# Altium PCB Car_wash_machine.PcbDoc (part 1 of 6)
Units mm, origin at the board's own origin, x right, y up, seen from the top; angles counter-clockwise.
Board outline 229.74 x 149.86 mm, 2 copper layers (Top Layer, Bottom Layer); 256 components, 170 nets, 868 pads, 731 vias.
Unrouted connection lines stored in the file: 362.
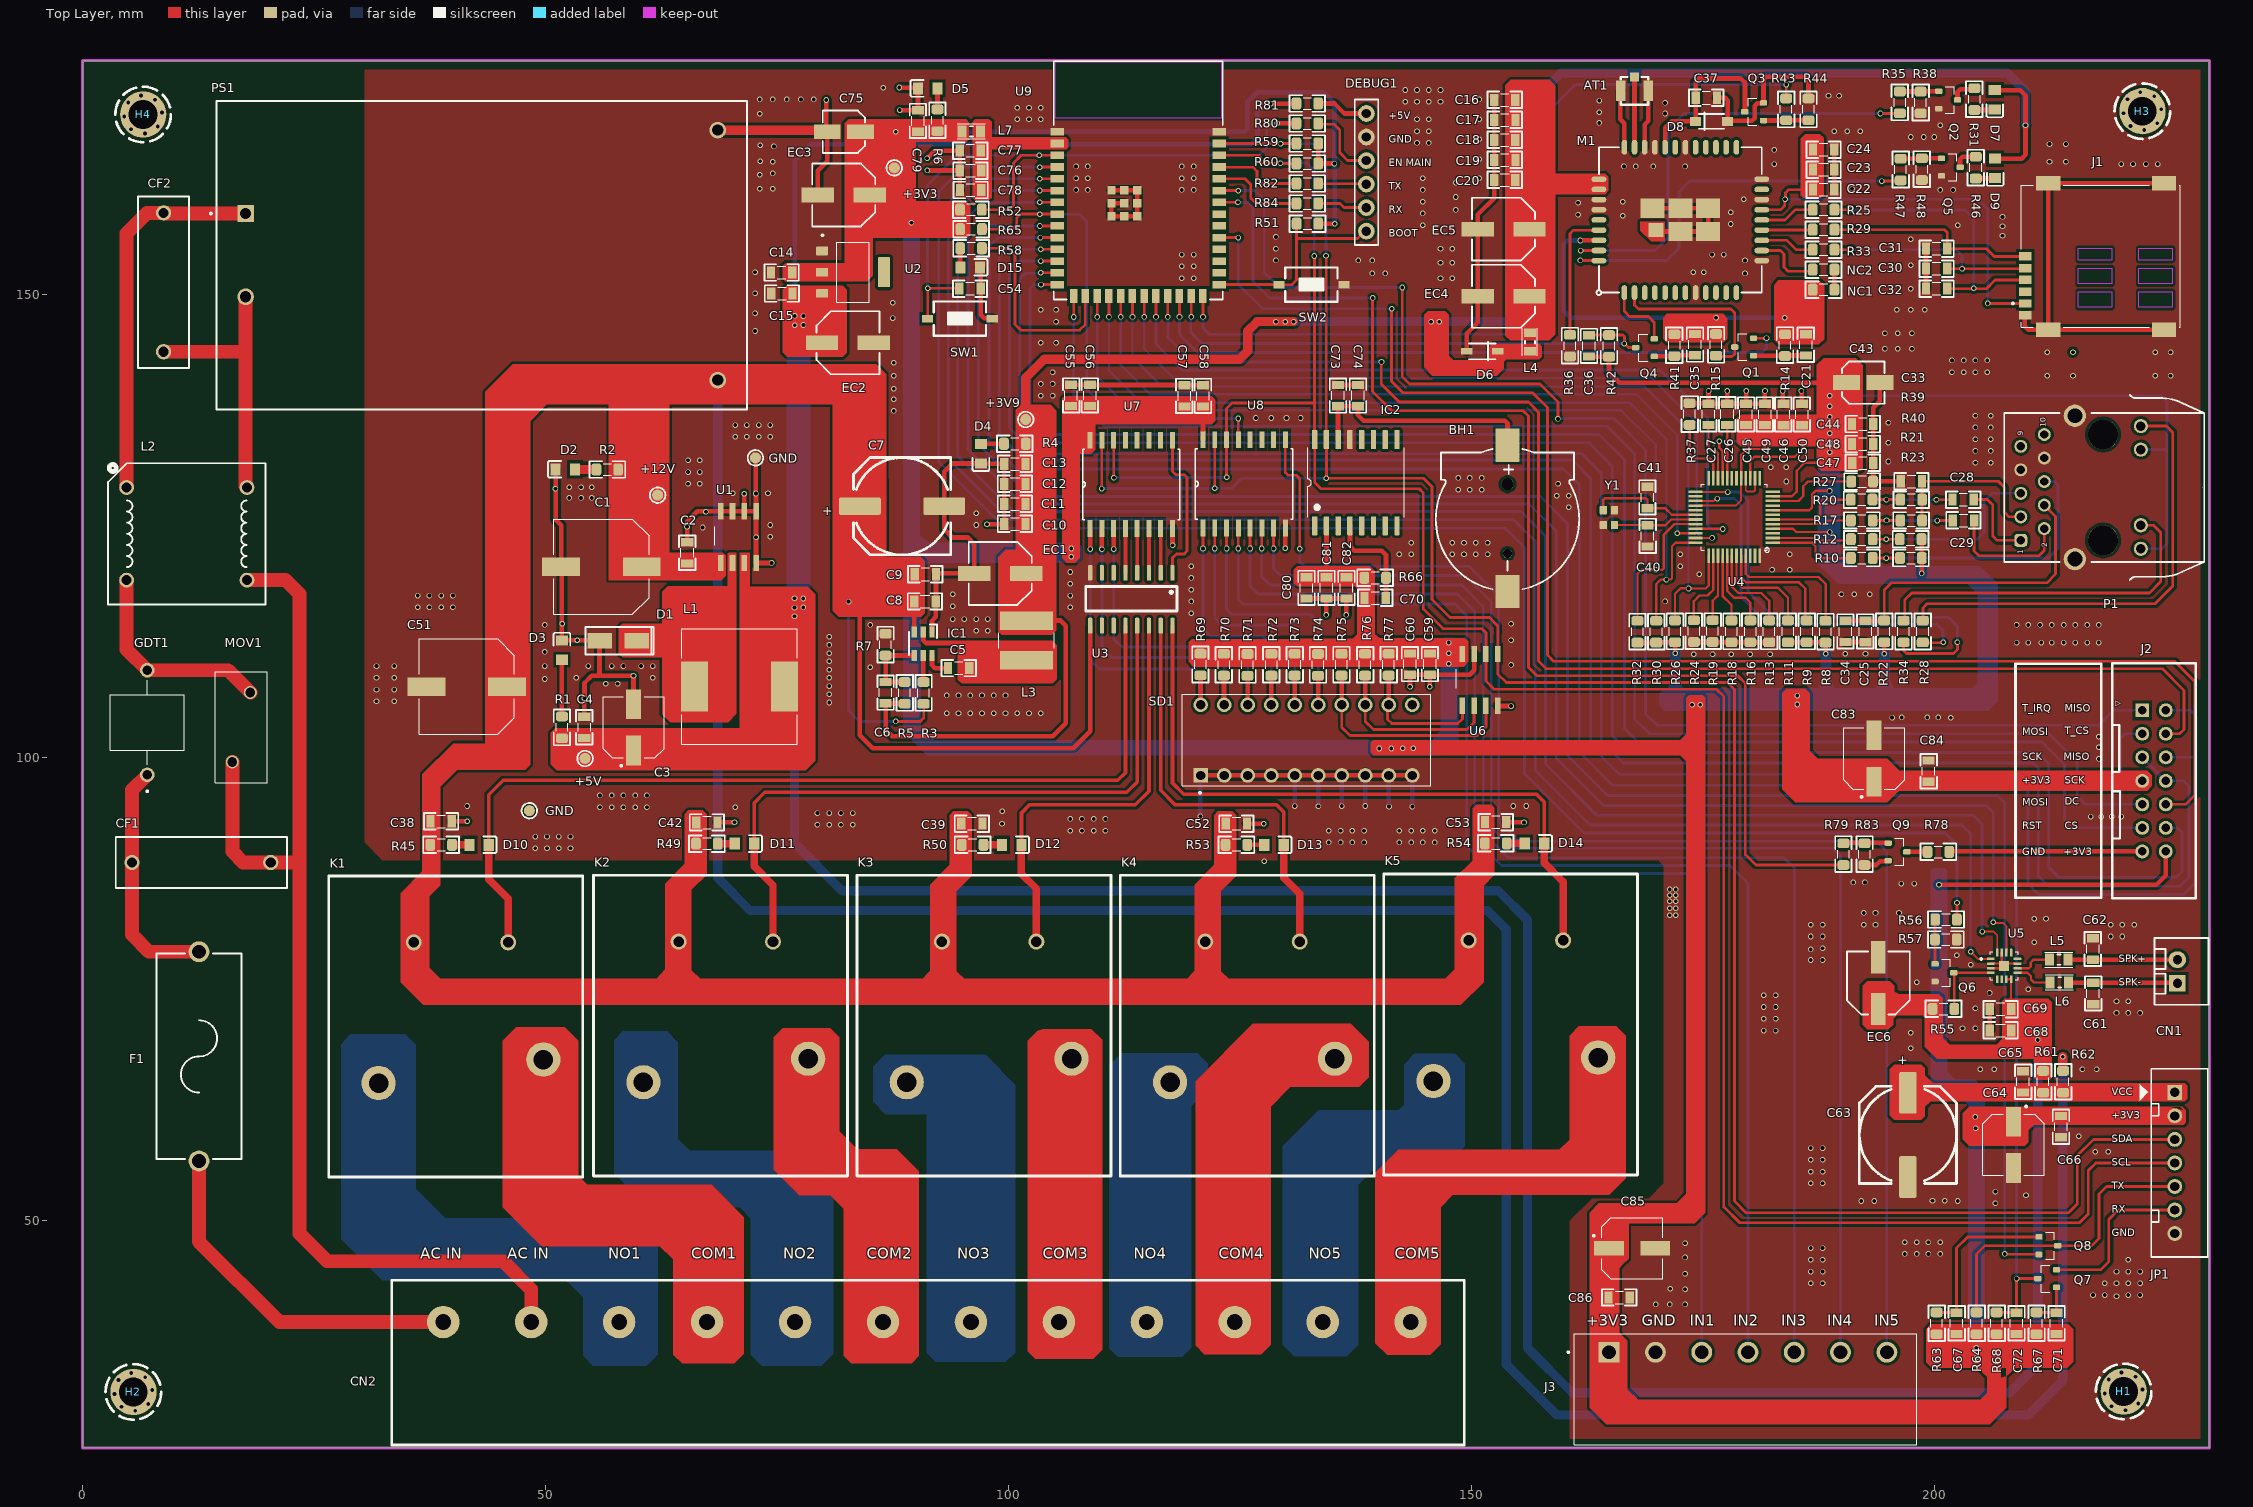
[diagram p0: Top Layer view]
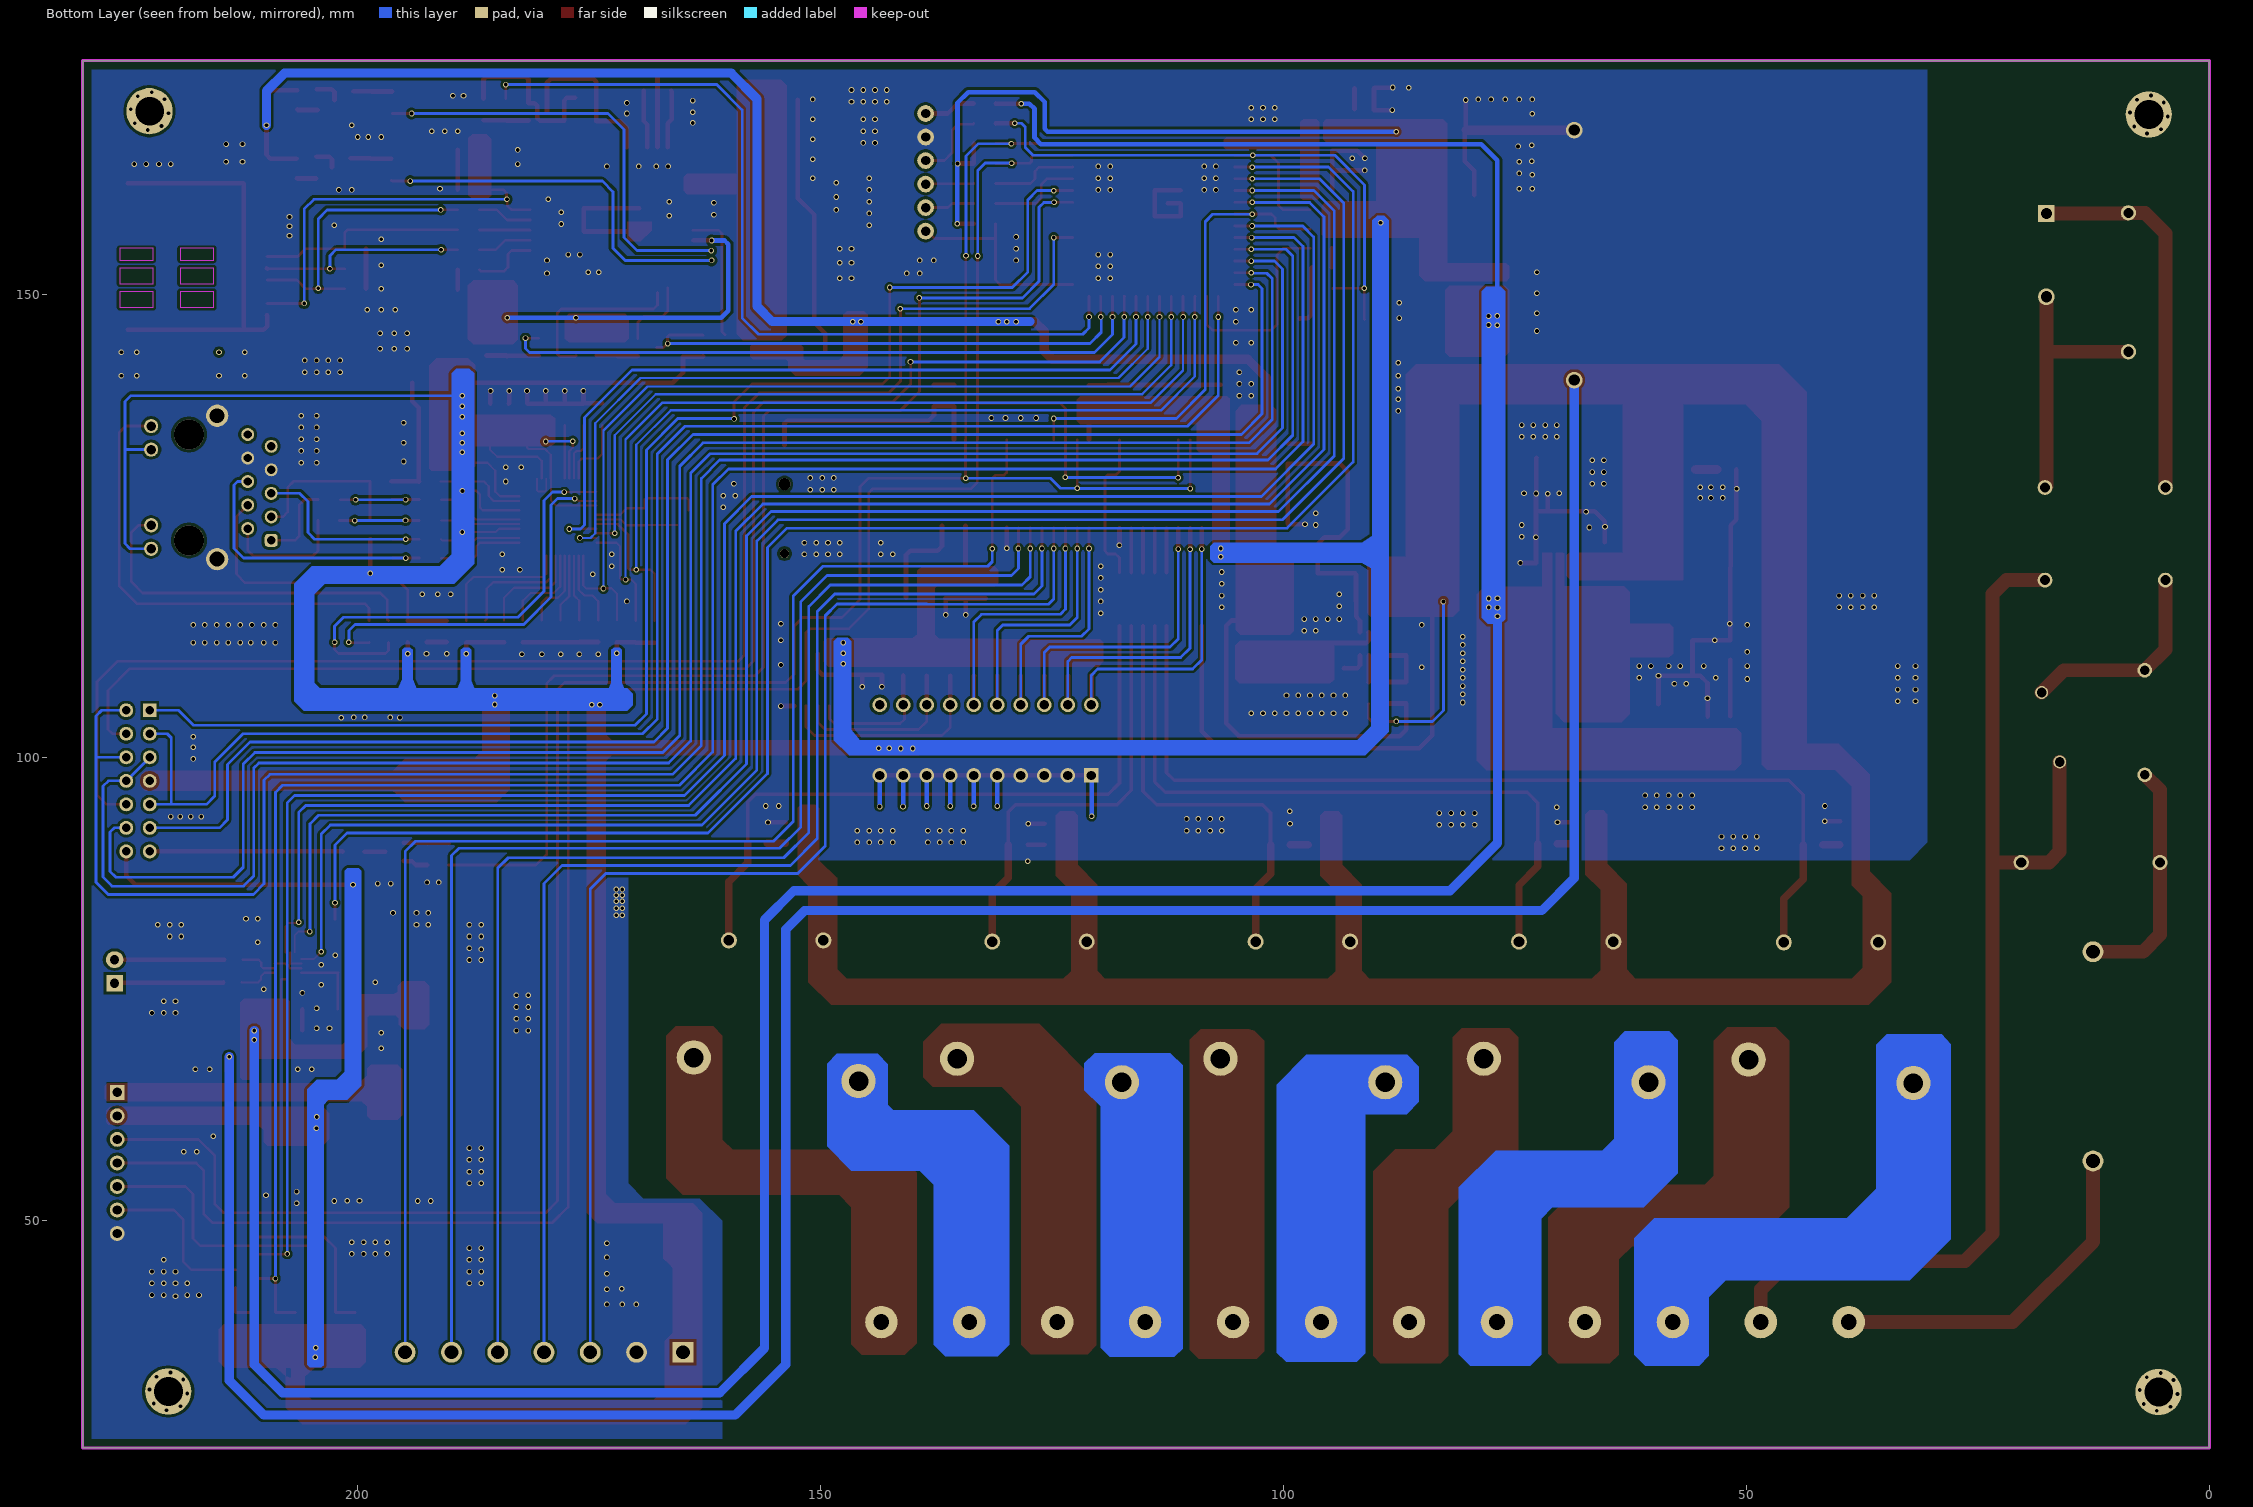
[diagram p1: Bottom Layer view, seen from below]
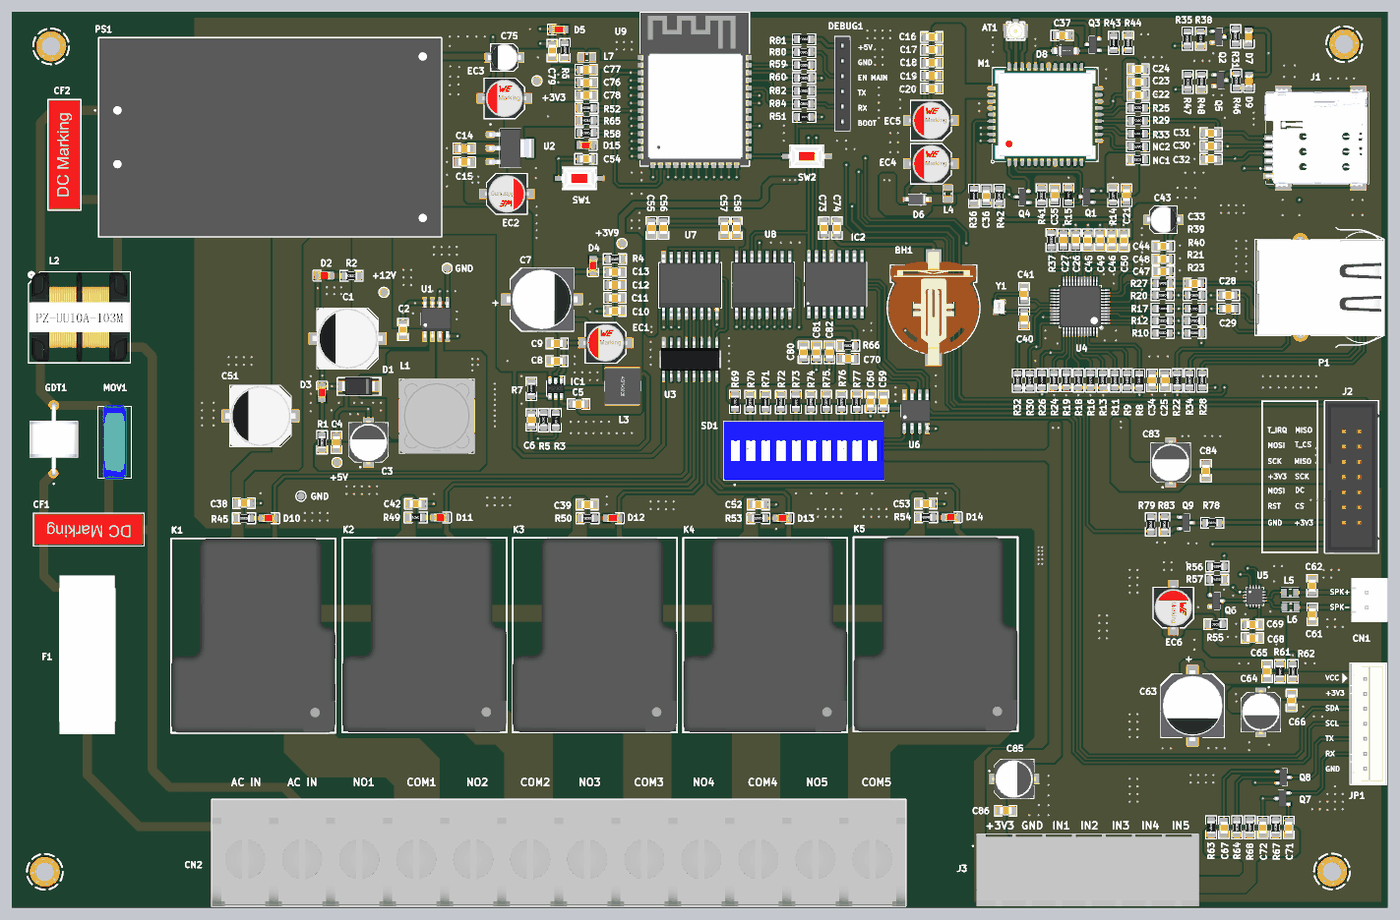
[diagram p4: 3D render of the assembled board from above, using the file's embedded part models]

## Layer stack, top to bottom
Top Solder: solder mask 0.0102, Solder Resist, Dk 3.5
Top Layer: signal copper 0.0356
Dielectric 1: dielectric 0.32, FR-4, Dk 4.8
Bottom Layer: signal copper 0.0356
Bottom Solder: solder mask 0.0102, Solder Resist, Dk 3.5

## Board outline
0,25.4 0,175.26 229.743,175.26 229.743,25.4

## Design rules (kind name [scope] priority, off if disabled: settings)
BoardOutlineClearance [All] p1: gap=1 ignorepadtopadclearanceinfootprint=FALSE
Clearance [All] p1: gap=0.3 ignorepadtopadclearanceinfootprint=FALSE
PolygonConnect [All] p1: connectstyle=Direct reliefconductorwidth=0.254 reliefentries=4 polygonreliefangle="90 Angle" airgapwidth=0.254
RoutingVias [All] p1: holewidth=0.6 width=0.8 viastyle="Through Hole" minholewidth=0.4 minwidth=0.6 maxholewidth=0.8 maxwidth=1
SolderMaskExpansion [All] p1: expansion=0.102 istentingtop=FALSE
Width [All] p1: maxlimit=2 minlimit=0.15 preferedwidth=0.5
30 further rules are at their usual default settings.

## Classes and differential pairs
component class POWER_CAR_WASH_MACHINE: +3V3 +3V9 +5V +12V ? C1 C2 C3 C4 C5 C6 C7 C8 C9 C10 C11 C12 C13 C14 C15 CF1 CF2 D1 D2 D3 D4 D5 EC1 EC2 EC3 F1 GDT1 GND IC1 L1 L2 L3 LED? MOV1 PS1 R1 R2 R3 R4 R5 R6 R7 U1 U2
component class MCU_WASH_MACHINE: AT1 BH1 BH? C16 C17 C18 C19 C20 C21 C22 C23 C24 C25 C26 C27 C28 C29 C30 C31 C32 C33 C34 C35 C36 C37 C38 C39 C40 C41 C42 C43 C44 C45 C46 C47 C48 C49 C50 C51 C52 C53 C54 C55 C56 C57 C58 C59 C60 C61 C62 C63 C64 C65 C66 C67 C68 C69 C70 C71 C72 C73 C74 C75 C76 C77 C78 C79 C80 C81 C82 C83 C84 C85 C86 CN1 CN2 D6 D7 D8 D9 D10 D11 D12 D13 D14 D15 DEBUG1 EC4 EC5 EC6 H1 H2 H3 H4 IC2 J1 J2 J3 JP1 K1 K2 K3 K4 K5 L4 L5 L6 L7 M1 NC1 NC2 P1 Q1 Q2 Q3 Q4 Q5 Q6 Q7 Q8 Q9 R8 R9 R10 R11 R12 R13 R14 R15 R16 R17 R18 R19 R20 R21 R22 R23 R24 R25 R26 R27 R28 R29 R30 R31 R32 R33 R34 R35 R36 R37 R38 R39 R40 R41 R42 R43 R44 R45 R46 R47 R48 R49 R50 R51 R52 R53 R54 R55 R56 R57 R58 R59 R60 R61 R62 R63 R64 R65 R66 R67 R68 R69 R70 R71 R72 R73 R74 R75 R76 R77 R78 R79 R80 R81 R82 R83 R84 SD1 SW1 SW2 U3 U4 U5 U6 U7 U8 U9 Y1

## Components (designator, comment, footprint, x,y, rotation, side; value= is the part's Value field where it differs from the comment)
+3V3 "TP_1MM" PAD_SMD_D1.2MM 87.681,163.678 r90 top
+3V9 "TP_1MM" PAD_SMD_D1.2MM 101.879,136.487 r90 top
+5V "TP_1MM" "PAD_SMD_D1.2MM - duplicate1" 54.28,99.873 r90 top
+12V "TP_1MM" PAD_SMD_D1.2MM 62.116,128.321 r90 top
AT1 "Antenna_IPEX" IPEX 167.64,171.996 r90 top
BH1 "CR1220" BATT_HOLDER_COIL12.5MM 153.924,125.517 r270 top
C1 "CAP_ALU_470uF_35V_SMD" CAP_ALU_470UF_35V 56.051,120.587 r180 top
C2 "1uF 50V" CAP-CER_0805_L2W1.25H0.8_WAVE 65.316,122.092 r90 top
C3 "220uF_16V" "CAP ALUM 220UF 20% 16V SMD" 59.525,103.238 r90 top
C4 "0.1uF 50V" CAP-CER_0805_L2W1.25H0.6_WAVE 54.191,103.238 r90 top
C5 "0.33uF 50V" CAP-CER_0805_L2W1.25H0.6_WAVE 94.64,109.639 r0 top
C6 "1nF 50V" CAP-CER_0805_L2W1.25H0.6_WAVE 86.741,106.985 r90 top
C7 "220uF_35V" C_FC_220UF_35V 88.519,127.127 r0 top
C8 "10uF 25V" CAP-CER_0805_L2W1.25H0.8_WAVE 90.995,116.84 r0 top
C9 "0.1uF 50V" CAP-CER_0805_L2W1.25H0.6_WAVE 91.034,119.774 r0 top
C10 "22uF 25V" CAP-CER_0805_L2W1.25H0.6_WAVE 100.711,125.222 r180 top
C11 "22uF 25V" CAP-CER_0805_L2W1.25H0.6_WAVE 100.711,127.381 r180 top
C12 "10uF 25V" CAP-CER_0805_L2W1.25H0.8_WAVE 100.711,129.54 r180 top
C13 "0.1uF 50V" CAP-CER_0805_L2W1.25H0.6_WAVE 100.711,131.699 r180 top
C14 "0.1uF 50V" CAP-CER_0805_L2W1.25H0.6_WAVE 75.514,152.375 r180 top
C15 "0.1uF 50V" CAP-CER_0805_L2W1.25H0.6_WAVE 75.54,150.101 r180 top
C16 "10pF/50V" CAP-CER_0805_L2W1.25H0.6_WAVE 153.625,171.018 r0 top
C17 "33pF 50V" CAP-CER_0805_L2W1.25H0.6_WAVE 153.632,168.859 r0 top
C18 "1nF 50V" CAP-CER_0805_L2W1.25H0.6_WAVE 153.625,166.7 r0 top
C19 "0.1uF 50V" CAP-CER_0805_L2W1.25H0.6_WAVE 153.632,164.541 r0 top
C20 "1uF 50V" CAP-CER_0805_L2W1.25H0.8_WAVE 153.625,162.382 r0 top
C21 "1nF 50V" CAP-CER_0805_L2W1.25H0.6_WAVE 186.144,144.558 r270 top
C22 "0.22uF/25V" CAP-CER_0805_L2W1.25H0.6_Wave 188.069,161.315 r0 top
C23 "10uF 25V" CAP-CER_0805_L2W1.25H0.8_WAVE 188.069,163.474 r180 top
C24 "0.1uF 50V" CAP-CER_0805_L2W1.25H0.6_WAVE 188.069,165.633 r180 top
C25 "0.1uF 50V" CAP-CER_0805_L2W1.25H0.6_Wave 192.583,113.594 r90 top
C26 "10uF 25V" CAP-CER_0805_L2W1.25H0.8_WAVE 177.66,137.053 r270 top
C27 "0.1uF 50V" CAP-CER_0805_L2W1.25H0.6_WAVE 175.628,137.053 r270 top
C28 "6.8nF 50V" CAP-CER_0805_L2W1.25H0.6_WAVE 203.149,127.838 r180 top
C29 "6.8nF 50V" CAP-CER_0805_L2W1.25H0.6_WAVE 203.175,125.603 r180 top
C30 "22pF 50V" CAP-CER_0805_L2W1.25H0.6_WAVE 200.273,152.779 r180 top
C31 "22pF 50V" CAP-CER_0805_L2W1.25H0.6_WAVE 200.273,154.938 r180 top
C32 "22pF 50V" CAP-CER_0805_L2W1.25H0.6_WAVE 200.273,150.62 r180 top
C33 "0.1uF 50V" CAP-CER_0805_L2W1.25H0.6_Wave 197.554,129.819 r180 top
C34 "22nF 50V" CAP-CER_0805_L2W1.25H0.6_WAVE 190.424,113.607 r270 top
C35 "1nF 50V" CAP-CER_0805_L2W1.25H0.6_WAVE 174.18,144.577 r270 top
C36 "470pF 50V" CAP-CER_0805_L2W1.25H0.6_WAVE 162.725,144.443 r90 top
C37 "100pF 50V" CAP-CER_0805_L2W1.25H0.6_WAVE 175.4,171.247 r0 top
C38 "0.1uF 50V" CAP-CER_0805_L2W1.25H0.6_WAVE 38.728,93.091 r0 top
C39 "0.1uF 50V" CAP-CER_0805_L2W1.25H0.6_WAVE 96.068,92.837 r0 top
C40 "15pF 25V" CAP-CER_0805_L2W1.25H0.6_Wave 169.062,123.92 r270 top
C41 "15pF 25V" CAP-CER_0805_L2W1.25H0.6_Wave 169.037,128.067 r90 top
C42 "0.1uF 50V" CAP-CER_0805_L2W1.25H0.6_WAVE 67.437,92.964 r0 top
C43 "10uF 16V" C-ELEC-ALU-B-D4.0-H5.4-SM 192.345,140.475 r0 top
C44 "0.1uF 50V" CAP-CER_0805_L2W1.25H0.6_WAVE 192.291,136.004 r0 top
C45 "0.1uF 50V" CAP-CER_0805_L2W1.25H0.6_WAVE 179.692,137.046 r90 top
C46 "0.1uF 50V" CAP-CER_0805_L2W1.25H0.6_Wave 183.718,137.033 r90 top
C47 "0.1uF 50V" CAP-CER_0805_L2W1.25H0.6_WAVE 192.298,131.813 r0 top
C48 "0.1uF 50V" CAP-CER_0805_L2W1.25H0.6_WAVE 192.291,133.845 r0 top
C49 "0.1uF 50V" CAP-CER_0805_L2W1.25H0.6_WAVE 181.724,137.046 r90 top
C50 "0.1uF 50V" CAP-CER_0805_L2W1.25H0.6_WAVE 185.725,137.033 r90 top
C51 "CAP_ALU_470uF_35V_SMD" CAP_ALU_470UF_35V 41.504,107.645 r180 top
C52 "0.1uF 50V" CAP-CER_0805_L2W1.25H0.6_WAVE 124.638,92.837 r0 top
C53 "0.1uF 50V" CAP-CER_0805_L2W1.25H0.6_WAVE 152.647,92.989 r0 top
C54 "0.1uF 50V" CAP-CER_0805_L2W1.25H0.6_WAVE 95.86,150.622 r180 top
C55 "10uF 25V" CAP-CER_0805_L2W1.25H0.8_WAVE 106.794,139.09 r90 top
C56 "0.1uF 50V" CAP-CER_0805_L2W1.25H0.6_WAVE 108.814,139.09 r90 top
C57 "10uF 25V" CAP-CER_0805_L2W1.25H0.8_WAVE 119.012,139.04 r90 top
C58 "0.1uF 50V" CAP-CER_0805_L2W1.25H0.6_WAVE 121.031,139.04 r90 top
C59 "10uF 25V" CAP-CER_0805_L2W1.25H0.8_WAVE 145.542,110.071 r270 top
C60 "0.1uF 50V" CAP-CER_0805_L2W1.25H0.6_WAVE 143.383,110.071 r270 top
C61 "220pF 50V" CAP-CER_0805_L2W1.25H0.6_WAVE 217.195,74.491 r270 top
C62 "220pF 50V" CAP-CER_0805_L2W1.25H0.6_WAVE 217.145,79.293 r90 top
C63 "220uF_35V" C_FC_220UF_35V 197.18,59.207 r270 top
C64 "220uF_16V" "CAP ALUM 220UF 20% 16V SMD" 208.585,58.13 r270 top
C65 "0.1uF 50V" CAP-CER_0805_L2W1.25H0.6_WAVE 209.626,64.948 r90 top
C66 "0.1uF 50V" CAP-CER_0805_L2W1.25H0.6_WAVE 213.716,60.096 r270 top
C67 "1nF 50V" CAP-CER_0805_L2W1.25H0.6_Wave 202.438,38.862 r90 top
C68 "10uF 25V" CAP-CER_0805_L2W1.25H0.8_WAVE 207.181,70.51 r180 top
C69 "0.1uF 50V" CAP-CER_0805_L2W1.25H0.6_WAVE 207.181,72.796 r180 top
C70 "0.1uF 50V" CAP-CER_0805_L2W1.25H0.6_WAVE 139.629,117.234 r0 top
C71 "1nF 50V" CAP-CER_0805_L2W1.25H0.6_Wave 213.233,38.862 r90 top
C72 "470pF 50V" CAP-CER_0805_L2W1.25H0.6_Wave 208.915,38.862 r90 top
C73 "0.1uF 50V" CAP-CER_0805_L2W1.25H0.6_WAVE 135.611,139.072 r90 top
C74 "10uF 25V" CAP-CER_0805_L2W1.25H0.8_WAVE 137.77,139.072 r90 top
C75 "10uF 16V" C-ELEC-ALU-B-D4.0-H5.4-SM 82.233,167.576 r180 top
C76 "10uF 25V" CAP-CER_0805_L2W1.25H0.8_WAVE 95.91,163.373 r180 top
C77 "0.1uF 50V" CAP-CER_0805_L2W1.25H0.6_WAVE 95.885,165.532 r180 top
C78 "1nF 50V" CAP-CER_0805_L2W1.25H0.6_WAVE 95.923,161.277 r180 top
C79 "10uF 25V" CAP-CER_0805_L2W1.25H0.8_WAVE 90.233,168.738 r90 top
C80 "0.1uF 50V" CAP-CER_0805_L2W1.25H0.6_WAVE 132.207,118.305 r270 top
C81 "10uF 25V" CAP-CER_0805_L2W1.25H0.8_WAVE 134.366,118.305 r270 top
C82 "1nF 50V" CAP-CER_0805_L2W1.25H0.6_WAVE 136.525,118.305 r270 top
C83 "220uF_16V" "CAP ALUM 220UF 20% 16V SMD" 193.523,99.873 r90 top
C84 "0.1uF 50V" CAP-CER_0805_L2W1.25H0.6_WAVE 199.415,98.501 r90 top
C85 "220uF_16V" "CAP ALUM 220UF 20% 16V SMD" 167.386,46.965 r0 top
C86 "0.1uF 50V" CAP-CER_0805_L2W1.25H0.6_WAVE 165.989,41.656 r0 top
CF1 "0.1uF 275V" "CAP_FILM_TH; 18X5X11MM; PITCH15MM_LONG-PIN" 12.827,88.646 r180 top
CF2 "0.1uF 275V" "CAP_FILM_TH; 18X5X11MM; PITCH15MM_LONG-PIN" 8.75,151.313 r90 top
CN1 "2.54mm" 2P-2.54MM-DT 226.289,76.873 r90 top
CN2 "TERMINAL 12P" TERMINAL_12P_9.5MM 38.962,38.989 r0 top
D1 "1N5822(SS34)-SM" SMA-J_DO-214AC 57.874,112.598 r0 top
D2 "Red, 2V, 140°" LED_0805_RED 52.146,131.115 r0 top
D3 "Red, 2V, 140°" LED_0805_RED 51.778,111.582 r270 top
D4 "PWR SIM" LED_0805_RED 97.041,132.791 r90 top
D5 "Red, 2V, 140°" LED_0805_RED 91.304,172.263 r0 top
D6 "SMF5.0A TVS Diode" SOD-123 151.191,143.857 r180 top
D7 "Amber, 2V, 140°" LED_0805_AMBER 206.554,171.023 r90 top
D8 "SMF5.0A" SOD-123F/SOD-123FL 175.953,168.694 r0 top
D9 "Amber, 2V, 140°" LED_0805_AMBER 206.601,163.618 r90 top
D10 "Red, 2V, 140°" LED_0805_RED 42.833,90.551 r180 top
D11 "Red, 2V, 140°" LED_0805_RED 71.501,90.678 r180 top
D12 "Red, 2V, 140°" LED_0805_RED 100.364,90.551 r180 top
D13 "Red, 2V, 140°" LED_0805_RED 128.702,90.551 r180 top
D14 "Red, 2V, 140°" LED_0805_RED 156.845,90.703 r180 top
D15 "Red, 2V, 140°" LED_0805_RED 95.876,152.933 r180 top
DEBUG1 "DEBUG" JP1X6F-P2.54-TH 138.684,163.195 r270 top
EC1 "100uF 16V" CAP_ALU;SMD,D6.3H5.8 99.13,119.863 r0 top
EC2 "100uF 16V" CAP_ALU;SMD,D6.3H5.8 82.677,144.78 r180 top
EC3 "100uF 16V" CAP_ALU;SMD,D6.3H5.8 82.226,160.744 r0 top
EC4 "100uF 16V" CAP_ALU;SMD,D6.3H5.8 153.499,149.809 r0 top
EC5 "100uF 16V" CAP_ALU;SMD,D6.3H5.8 153.499,157.048 r0 top
EC6 "100uF 16V" CAP_ALU;SMD,D6.3H5.8 193.98,75.616 r270 top
F1 "FUSE" FUSE_BOX_D5L20MM 12.573,67.691 r90 top
GDT1 "470V 5KA" GDT;470V,5KA 6.985,103.759 r90 top
GND "TP_1MM" PAD_SMD_D1.2MM 48.26,94.234 r90 top
GND "TP_1MM" PAD_SMD_D1.2MM 72.682,132.347 r90 top
H1 "HOLE_3M" HOLE_M3 219.964,34.417 r0 top
H2 "HOLE_3M" HOLE_M3 4.976,34.364 r0 top
H3 "HOLE_3M" HOLE_M3 221.996,172.72 r0 top
H4 "HOLE_3M" HOLE_M3 6.022,172.362 r0 top
IC1 "AP62300" SOT-23-6 90.805,112.268 r270 top
IC2 "DS3231SN#T&R" SOIC_16_WIDE 137.541,129.667 r90 top
J1 "MSIM-2-A" MSIM-2-A 218.022,154.1 r90 top
J2 "14P_2.54MM" HEADER_2.54MM_1X7P 223.761,97.46 r270 top
J3 "TERMINAL_7P_5.08" TE_796644-7 179.651,31.738 r0 top
JP1 "JP7" CON7 226.009,56.185 r270 top value="Connector 7"
K1 "Relay_4P_30A_1" RELAY_4P_PR23-24V-900-1A 40.374,70.85 r180 top
K2 "Relay_4P_30A_1" RELAY_4P_PR23-24V-900-1A 68.979,70.937 r180 top
K3 "Relay_4P_30A_1" RELAY_4P_PR23-24V-900-1A 97.427,70.937 r180 top
K4 "Relay_4P_30A_1" RELAY_4P_PR23-24V-900-1A 125.875,70.937 r180 top
K5 "Relay_4P_30A_1" RELAY_4P_PR23-24V-900-1A 154.323,71.064 r180 top
L1 "68uH 3A" 12X12_68uH_2A 70.955,107.645 r0 top
L2 "SU10VD-10020" CHOKE_UU10 11.252,124.142 r0 top
L3 "3.3uH 3.4A" "IND_SMD 6X6X2.8MM" 101.956,112.624 r90 top
L4 "BLM21PG300SN1D" L0805 156.35,144.856 r90 top value=1K
L5 "BLM21PG300SN1D" L0805 213.462,78.143 r180 top value=1K
L6 "BLM21PG300SN1D" L0805 213.538,75.692 r180 top value=1K
L7 "BLM21PG300SN1D" L0805 95.99,167.615 r180 top value=1K
M1 "SIM A7680C" "IC_SIM_A7682S/A7680C - duplicate" 172.593,158.046 r90 top
MOV1 "470V 2.5KA" VARISTOR_DISC10MM 17.145,103.251 r90 top
NC1 "47K 1%" RESISTOR_0805_WAVE 188.062,150.52 r0 top
NC2 "0R 0805" RESISTOR_0805_WAVE 188.062,152.679 r180 top
P1 "RJ45-HY931147C" CONN_TH_RJ45_1PORT_10P_7499111121A 218.259,129.151 r90 top
PS1 "HILINK 12V20W" MODULE_POWER_HLK-20M05 43.112,154.246 r0 top
Q1 "NPN 25V 1.5A" "MOS-FET; SOT23" 179.482,144.32 r180 top
Q2 "NPN 25V 1.5A" "MOS-FET; SOT23" 201.525,171.01 r0 top
Q3 "NPN 25V 1.5A" "MOS-FET; SOT23" 180.569,169.736 r180 top
Q4 "NPN 25V 1.5A" "MOS-FET; SOT23" 168.77,144.259 r180 top
Q5 "NPN 25V 1.5A" "MOS-FET; SOT23" 201.816,163.748 r0 top
Q6 "NPN 25V 1.5A" "MOS-FET; SOT23" 201.117,76.733 r0 top
Q7 "NPN 25V 1.5A" "MOS-FET; SOT23" 212.344,47.244 r0 top
Q8 "NPN 25V 1.5A" "MOS-FET; SOT23" 212.217,43.688 r180 top
Q9 "N-CH 20V 2.8A" "MOS-FET; SOT23" 196.05,89.789 r0 top
R1 "1K 0805" RESISTOR_0805_WAVE 51.778,103.238 r270 top
R2 "4k7 1%" RESISTOR_0805_WAVE 56.68,131.089 r0 top
R3 "100K 1%" RESISTOR_0805_WAVE 90.843,106.953 r90 top
R4 "330R 1%" RESISTOR_0805_WAVE 100.698,133.871 r0 top
R5 "39K 1%" RESISTOR_0805_WAVE 88.798,106.959 r270 top
R6 "330R 1%" RESISTOR_0805_WAVE 92.342,168.815 r270 top
R7 "10K 1%" RESISTOR_0805_WAVE 86.741,112.166 r270 top
R8 "10K 1%" RESISTOR_0805_WAVE 188.278,113.57 r270 top
R9 "10K 1%" RESISTOR_0805_WAVE 186.245,113.602 r270 top
R10 "33R 1%" RESISTOR_0805_WAVE 192.196,121.526 r180 top
R11 "10K 1%" RESISTOR_0805_WAVE 184.213,113.602 r270 top
R12 "33R 1%" RESISTOR_0805_WAVE 192.196,123.558 r180 top
R13 "10K 1%" RESISTOR_0805_WAVE 182.181,113.602 r270 top
R14 "4k7 1%" RESISTOR_0805_WAVE 183.896,144.52 r90 top
R15 "4k7 1%" RESISTOR_0805_WAVE 176.454,144.551 r90 top
R16 "10K 1%" RESISTOR_0805_WAVE 180.149,113.602 r270 top
R17 "33R 1%" RESISTOR_0805_WAVE 192.196,125.59 r180 top
R18 "10K 1%" RESISTOR_0805_WAVE 178.118,113.602 r270 top
R19 "10K 1%" RESISTOR_0805_WAVE 176.085,113.633 r270 top
R20 "33R 1%" RESISTOR_0805_WAVE 192.176,127.838 r180 top
R21 "49.9R 1%" RESISTOR_0805_WAVE 197.466,123.558 r180 top
R22 "10R 1%" RESISTOR_0805_WAVE 194.615,113.602 r90 top
R23 "49.9R 1%" RESISTOR_0805_WAVE 197.498,121.526 r180 top
R24 "10K 1%" RESISTOR_0805_WAVE 174.053,113.633 r270 top
R25 "22R 1%" RESISTOR_0805_WAVE 188.062,159.156 r180 top
R26 "10K 1%" RESISTOR_0805_WAVE 172.022,113.602 r270 top
R27 "12.1K 1%" RESISTOR_0805_WAVE 192.227,129.794 r180 top
R28 "330R 1%" RESISTOR_0805_WAVE 198.78,113.589 r270 top
R29 "22R 1%" RESISTOR_0805_WAVE 188.062,156.997 r180 top
R30 "10K 1%" RESISTOR_0805_WAVE 169.989,113.57 r270 top
R31 "2K2" RESISTOR_0805_WAVE 204.357,171.099 r270 top
R32 "10K 1%" RESISTOR_0805_WAVE 167.957,113.57 r270 top
R33 "22R 1%" RESISTOR_0805_WAVE 188.062,154.838 r180 top
R34 "330R 1%" RESISTOR_0805_WAVE 196.698,113.589 r270 top
R35 "4k7 1%" RESISTOR_0805_WAVE 196.304,170.745 r90 top
R36 "22R 1%" RESISTOR_0805_WAVE 160.668,144.469 r90 top
R37 "10K 1%" RESISTOR_0805_WAVE 173.596,137.078 r270 top
R38 "47K 1%" RESISTOR_0805_WAVE 198.552,170.739 r90 top
R39 "49.9R 1%" RESISTOR_0805_WAVE 197.536,127.838 r0 top
R40 "49.9R 1%" RESISTOR_0805_WAVE 197.53,125.59 r0 top
R41 "4k7 1%" RESISTOR_0805_WAVE 171.945,144.513 r90 top
R42 "4k7 1%" RESISTOR_0805_WAVE 164.884,144.437 r270 top
R43 "4k7 1%" RESISTOR_0805_WAVE 184.023,169.996 r270 top
R44 "47K 1%" RESISTOR_0805_WAVE 186.436,169.996 r270 top
R45 "1K 0805" RESISTOR_0805_WAVE 38.735,90.551 r180 top
R46 "2K2" RESISTOR_0805_WAVE 204.506,163.701 r270 top
R47 "4k7 1%" RESISTOR_0805_WAVE 196.393,163.494 r90 top
R48 "47K 1%" RESISTOR_0805_WAVE 198.679,163.532 r90 top
R49 "1K 0805" RESISTOR_0805_WAVE 67.437,90.678 r180 top
R50 "1K 0805" RESISTOR_0805_WAVE 96.139,90.551 r180 top
R51 "10K 1%" RESISTOR_0805_WAVE 132.315,157.645 r0 top
R52 "100K 1%" RESISTOR_0805_WAVE 95.961,159.156 r180 top
R53 "1K 0805" RESISTOR_0805_WAVE 124.638,90.551 r180 top
R54 "1K 0805" RESISTOR_0805_WAVE 152.654,90.703 r180 top
R55 "680K 1%" RESISTOR_0805_WAVE 201.016,72.822 r0 top
R56 "1K 0805" RESISTOR_0805_WAVE 201.295,82.474 r180 top
R57 "10K 1%" RESISTOR_0805_WAVE 201.27,80.315 r180 top
R58 "330R 1%" RESISTOR_0805_WAVE 95.98,154.991 r0 top
R59 "4k7 1%" RESISTOR_0805_WAVE 132.296,166.306 r0 top
R60 "4k7 1%" RESISTOR_0805_WAVE 132.296,164.147 r0 top
R61 "0R 0805" RESISTOR_0805_Wave 211.785,64.948 r90 top
R62 "0R 0805" RESISTOR_0805_Wave 213.944,64.948 r90 top
R63 "4k7 1%" RESISTOR_0805_Wave 200.279,38.862 r270 top
R64 "4k7 1%" RESISTOR_0805_Wave 204.597,38.862 r270 top
R65 "10K 1%" RESISTOR_0805_WAVE 95.974,157.048 r180 top
R66 "10K 1%" RESISTOR_0805_WAVE 139.629,119.393 r180 top
R67 "4k7 1%" RESISTOR_0805_Wave 211.074,38.862 r270 top
R68 "4k7 1%" RESISTOR_0805_Wave 206.756,38.862 r270 top
R69 "10K 1%" RESISTOR_0805_WAVE 120.752,110.027 r90 top
R70 "10K 1%" RESISTOR_0805_WAVE 123.279,110.001 r90 top
R71 "10K 1%" RESISTOR_0805_WAVE 125.832,109.989 r90 top
R72 "10K 1%" RESISTOR_0805_WAVE 128.41,110.001 r90 top
R73 "10K 1%" RESISTOR_0805_WAVE 130.937,110.014 r90 top
R74 "10K 1%" RESISTOR_0805_WAVE 133.452,109.989 r90 top
R75 "10K 1%" RESISTOR_0805_WAVE 135.992,110.014 r90 top
R76 "10K 1%" RESISTOR_0805_WAVE 138.544,110.001 r90 top
R77 "10K 1%" RESISTOR_0805_WAVE 141.084,110.014 r90 top
R78 "330R 1%" RESISTOR_0805_WAVE 200.463,89.789 r0 top
R79 "1K 0805" RESISTOR_0805_WAVE 190.208,89.535 r90 top
R80 "10K 1%" RESISTOR_0805_WAVE 132.296,168.465 r0 top
R81 "0R 0805" RESISTOR_0805_WAVE 132.296,170.624 r180 top
R82 "0R 0805" RESISTOR_0805_WAVE 132.296,161.988 r0 top
R83 "10K 1%" RESISTOR_0805_WAVE 192.494,89.535 r90 top
R84 "0R 0805" RESISTOR_0805_WAVE 132.296,159.829 r0 top
SD1 "SW - DIP10" SW_DS01C-254-S-10BE 132.207,101.854 r0 top value="SW - DIP12"
SW1 "Nut Nhan 2 Chan SMD 3x6x2.5" "NUT NHAN 2 CHAN SMD 3X6X2.5" 94.767,147.383 r180 top
SW2 "Nut Nhan 2 Chan SMD 3x6x2.5" "NUT NHAN 2 CHAN SMD 3X6X2.5" 132.74,151.054 r180 top
U1 "XL1509" SOP8 70.841,123.78 r0 top
U2 "AMS1117-3.3V" SOT223 83.228,152.404 r270 top
U3 "ULN2003_SMD" ULN2003 117.729,119.926 r180 top
U4 "W5500" IC_48LQFP 178.411,125.943 r180 top
U5 "MAX98357AETE+T" QFN50P300X300X80-17N 207.569,77.47 r0 top
U6 "MB85RC256VPF-G-JNERE2" SOP8 150.952,108.375 r0 top
U7 "PCF8574AT" SOIC127P1032X265-16N 113.284,129.489 r90 top
U8 "PCF8574AT" SOIC127P1032X265-16N 125.476,129.54 r90 top
U9 "ESP32-S3-WROOM-1(N16R8)" ESP32-S3-WROOM-1 114.033,162.317 r0 top
Y1 "Q22FA12800120" ABM10 164.881,125.895 r90 top

## Footprints (in the part's own frame and the unit in brackets; to place one, negate y for a bottom-side part, rotate by r counter-clockwise, add the part's x,y. Pads: shape width x height; smd on the part's side, far side on the other; paste and mask are expansions set on the pad)
2P-2.54MM-DT [mil]
  rect 70x70 hole 39.37 unplated: 1(-50,0)
  oval 70x75 hole 39.37 unplated: 2(50,0)
  silkscreen extent -142,-132 142,98, body extent -142,-132 142,98, height 286
12X12_68uH_2A [mm]
  rect 2.9x5.4 smd: 1(-4.85,0) 2(4.85,0)
  silkscreen extent -6.25,-6.25 6.25,6.25, body extent -6.25,-6.25 6.25,6.25, height 6
ABM10 [mm]
  rrect25% 0.9x0.8 smd: 1(-0.8,-0.6) 2(0.8,-0.6) 3(0.8,0.6) 4(-0.8,0.6)
  body extent -1.24,-1 1.24,1, height 0.51
BATT_HOLDER_COIL12.5MM [mm]
  rect 3.6x2.6 smd: 1(-8.18,0) 2(7.61,0)
  round 1.3 hole 1.3 unplated: ""(-3.98,0)
  round 1 hole 1 unplated: ""(3.51,0)
  silkscreen extent -7.78,-7.75 7.37,7.75, body extent -9.49,-7.58 9.31,7.56, height 4.18
C-ELEC-ALU-B-D4.0-H5.4-SM [mm]
  rect 2.9x1.6 smd: 1(-1.8,0) 2(1.8,0)
  silkscreen extent -2.29,-2.29 2.29,2.29, body extent -2.75,-2.25 2.75,2.25, height 5.5
C_FC_220UF_35V [mm] "ALUMINUM CAPACITOR 10.5x10.5x10.5mm"
  rrect20% 4.5x1.9 smd mask+0.1: 1(-4.55,0) 2(4.55,0)
  silkscreen extent -5.25,-5.25 5.25,5.25, body extent -5.9,-5.25 5.9,5.25, height 10.5
"CAP ALUM 220UF 20% 16V SMD" [mm]
  rect 3.2x1.6 smd: 1(-2.5,0) 2(2.5,0)
  silkscreen extent -4.25,-3.3 3.3,3.3, body extent -3.65,-3.3 3.65,3.3, height 7.7
CAP-CER_0805_L2W1.25H0.6_WAVE [mm]
  rect 0.9x1.3 smd: 1(-1.15,0) 2(1.15,0)
  silkscreen extent -1.85,-0.89 1.85,0.89, body extent -1,-0.62 1,0.63, height 0.6
CAP-CER_0805_L2W1.25H0.6_Wave [mm]
  rect 0.9x1.3 smd: 1(-1.15,0) 2(1.15,0)
  silkscreen extent -1.85,-0.89 1.85,0.89, body extent -1,-0.62 1,0.63, height 0.6
CAP-CER_0805_L2W1.25H0.8_WAVE [mm]
  rect 0.9x1.3 smd: 1(-1.15,0) 2(1.15,0)
  silkscreen extent -1.85,-0.89 1.85,0.89, body extent -1,-0.62 1,0.63, height 0.8
CAP_ALU;SMD,D6.3H5.8 [mm]
  rect 3.5x1.6 smd: 1(2.8,0) 2(-2.8,0)
  silkscreen extent -3.4,-3.4 3.4,3.4, body extent -3.65,-3.3 3.65,3.3, height 5.8
CAP_ALU_470UF_35V [mm]
  rect 4.1x2 smd: 1(-4.35,0) 2(4.35,0)
  silkscreen extent -5.15,-5.15 5.15,5.15, body extent -5.85,-5.15 5.85,5.15, height 10.5
"CAP_FILM_TH; 18X5X11MM; PITCH15MM_LONG-PIN" [mm]
  round 1.65 hole 1.1: 1(-7.5,0) 2(7.5,0)
  silkscreen extent -9.25,-2.75 9.25,2.75, body extent -9,-2.5 9,2.5, height 11.05
CHOKE_UU10 [mm]
  round 1.6 hole 1.1: 1(-6.5,5) 2(6.5,5) 3(6.5,-5) 4(-6.5,-5)
  silkscreen extent -8.51,-7.62 8.51,7.62, body extent -8.38,-7.5 8.41,7.5, height 16.3
CON7 [mm] "CON7"
  rect 1.6x1.6 hole 1 mask+0.1: 1(-7.62,0)
  round 1.6 hole 1 mask+0.1: 2(-5.08,0) 3(-2.54,0) 4(0,0) 5(2.54,0) 6(5.08,0) 7(7.62,0)
  silkscreen extent -10.16,-3.8 10.16,3.56, body extent -10.05,-2.29 10.05,3.41, height 7
CONN_TH_RJ45_1PORT_10P_7499111121A [mm]
  rrect50% 1.4x1.4 hole 0.9: 1(-5.715,8.89)
  round 1.4 hole 0.9: 2(-4.445,6.35) 3(-3.175,8.89) 4(-1.905,6.35) 5(-0.635,8.89) 6(0.635,6.35) 7(1.905,8.89) 8(3.175,6.35) 9(4.445,8.89) 10(5.715,6.35)
  round 1.53 hole 1.03: 11(-6.625,-4.08) 12(-4.085,-4.08) 13(4.085,-4.08) 14(6.625,-4.08)
  round 3.25 hole 3.25 unplated: MH1(-5.715,0) MH2(5.715,0)
  round 2.4 hole 1.6: Shell(-7.745,3.05) Shell(7.745,3.05)
  silkscreen extent -10,-10.92 10,10.68, body extent -9.35,-10.89 9.35,10.36, height 14.85
ESP32-S3-WROOM-1 [mil]
  rect 59x32 smd paste+0 mask+0: 1(-344.49,207.09) 2(-344.49,157.09) 3(-344.49,107.09) 4(-344.49,57.09) 5(-344.49,7.09) 6(-344.49,-42.91) 7(-344.49,-92.91) 8(-344.49,-142.91) 9(-344.49,-192.91) 10(-344.49,-242.91) 11(-344.49,-292.91) 12(-344.49,-342.91) 13(-344.49,-392.91) 14(-344.49,-442.91) 27(344.49,-442.91) 28(344.49,-392.91) 29(344.49,-342.91) 30(344.49,-292.91) 31(344.49,-242.91) 32(344.49,-192.91) 33(344.49,-142.91) 34(344.49,-92.91) 35(344.49,-42.91) 36(344.49,7.09) 37(344.49,57.09) 38(344.49,107.09) 39(344.49,157.09) 40(344.49,207.09)
  rect 32x59 smd paste+0 mask+0: 15(-275,-492.13) 16(-225,-492.13) 17(-175,-492.13) 18(-125,-492.13) 19(-75,-492.13) 20(-25,-492.13) 21(25,-492.13) 22(75,-492.13) 23(125,-492.13) 24(175,-492.13) 25(225,-492.13) 26(275,-492.13)
  rect 35x35 smd paste+0 mask+0: 41(-59.06,-96.85) 42(-114.17,-41.73) 43(-114.17,-96.85) 44(-114.17,-151.97) 45(-59.06,-151.97) 46(-3.94,-151.97) 47(-3.94,-96.85) 48(-3.94,-41.73) 49(-59.06,-41.73)
  Top Layer keep-out region: 354.5,502 -354.5,502 -354.5,266 354.5,266
  silkscreen extent -360,-507 360,507, body extent -354,-502 354,502, height 128
FUSE_BOX_D5L20MM [mm]
  round 2.25 hole 1.5: 1(-11.3,0) 2(11.3,0)
  silkscreen extent -11.1,-4.6 11.1,4.6, body extent -13.25,-4.6 13.25,4.6, height 16.5
GDT;470V,5KA [mm]
  round 1.575 hole 1.05: A(-5.65,0) B(5.65,0)
  silkscreen extent -7.54,-4 4.54,4, body extent -6.05,-4 6.05,4, height 8
HEADER_2.54MM_1X7P [mm]
  rect 1.501x1.501 hole 0.899: 1(-7.62,-1.27)
  round 1.501 hole 0.899: 2(-7.62,1.27) 3(-5.08,-1.27) 4(-5.08,1.27) 5(-2.54,-1.27) 6(-2.54,1.27) 7(0,-1.27) 8(0,1.27) 9(2.54,-1.27) 10(2.54,1.27) 11(5.08,-1.27) 12(5.08,1.27) 13(7.62,-1.27) 14(7.62,1.27)
  silkscreen extent -12.7,-4.5 12.7,4.5, body extent -12.7,-4.44 12.74,4.66, height 8.93
HOLE_M3 [mm]
  round 0.5 hole 0.4 copper offset -0.02,0 paste-2539.97 mask+0.1: 1(-1.537,-3.137)
  round 0.5 hole 0.4 copper offset -0.014,0.014 paste-2539.97 mask+0.1: 1(-1.09,-1.628)
  round 0.5 hole 0.4 copper offset -0.014,-0.014 paste-2539.97 mask+0.1: 1(-0.785,-4.519)
  round 0.5 hole 0.4 copper offset 0,0.02 paste-2539.97 mask+0.1: 1(0.292,-0.876)
  round 5 hole 3.1 copper offset 0.02,0 paste-2539.97 mask+0.1: 1(0.508,-2.921)
  round 0.5 hole 0.4 copper offset 0,-0.02 paste-2539.97 mask+0.1: 1(0.724,-4.966)
  round 0.5 hole 0.4 copper offset 0.014,0.014 paste-2539.97 mask+0.1: 1(1.801,-1.323)
  round 0.5 hole 0.4 copper offset 0.014,-0.014 paste-2539.97 mask+0.1: 1(2.106,-4.214)
  round 0.5 hole 0.4 copper offset 0.02,0 paste-2539.97 mask+0.1: 1(2.553,-2.705)
  silkscreen extent -2.49,-5.92 3.51,0.08
IC_48LQFP [mm]
  rect 1.56x0.28 smd: 1(-4.18,2.75) 2(-4.18,2.25) 3(-4.18,1.75) 4(-4.18,1.25) 5(-4.18,0.75) 6(-4.18,0.25) 7(-4.18,-0.25) 8(-4.18,-0.75) 9(-4.18,-1.25) 10(-4.18,-1.75) 11(-4.18,-2.25) 12(-4.18,-2.75) 25(4.18,-2.75) 26(4.18,-2.25) 27(4.18,-1.75) 28(4.18,-1.25) 29(4.18,-0.75) 30(4.18,-0.25) 31(4.18,0.25) 32(4.18,0.75) 33(4.18,1.25) 34(4.18,1.75) 35(4.18,2.25) 36(4.18,2.75)
  rect 0.28x1.56 smd: 13(-2.75,-4.18) 14(-2.25,-4.18) 15(-1.75,-4.18) 16(-1.25,-4.18) 17(-0.75,-4.18) 18(-0.25,-4.18) 19(0.25,-4.18) 20(0.75,-4.18) 21(1.25,-4.18) 22(1.75,-4.18) 23(2.25,-4.18) 24(2.75,-4.18) 37(2.75,4.18) 38(2.25,4.18) 39(1.75,4.18) 40(1.25,4.18) 41(0.75,4.18) 42(0.25,4.18) 43(-0.25,4.18) 44(-0.75,4.18) 45(-1.25,4.18) 46(-1.75,4.18) 47(-2.25,4.18) 48(-2.75,4.18)
  silkscreen extent -3.8,-3.55 3.55,3.8, body extent -4.5,-4.5 4.5,4.5, height 1.6
"IC_SIM_A7682S/A7680C - duplicate" [mm]
  oval 1.6x0.6 smd: 1(-7.85,6.05) 2(-7.85,4.95) 3(-7.85,3.85) 4(-7.85,2.75) 5(-7.85,1.65) 6(-7.85,0.55) 7(-7.85,-0.55) 8(-7.85,-1.65) 9(-7.85,-2.75) 10(-7.85,-3.85) 11(-7.85,-4.95) 12(-7.85,-6.05) 22(7.85,-6.05) 23(7.85,-4.95) 24(7.85,-3.85) 25(7.85,-2.75) 26(7.85,-1.65) 27(7.85,-0.55) 28(7.85,0.55) 29(7.85,1.65) 30(7.85,2.75) 31(7.85,3.85) 32(7.85,4.95) 33(7.85,6.05)
  oval 0.6x1.6 smd: 13(-4.4,-8.8) 14(-3.3,-8.8) 15(-2.2,-8.8) 16(-1.1,-8.8) 17(0,-8.8) 18(1.1,-8.8) 19(2.2,-8.8) 20(3.3,-8.8) 21(4.4,-8.8) 34(4.4,8.8) 35(3.3,8.8) 36(2.2,8.8) 37(1.1,8.8) 38(0,8.8) 39(-1.1,8.8) 40(-2.2,8.8) 41(-3.3,8.8) 42(-4.4,8.8)
  rect 1.5x1.6 smd: 87(-1.068,2.621)
  rect 2.1x2.6 smd: 88(-1.25,0) 89(-1.25,-3) 90(1.25,-3) 91(1.25,0) 92(1.25,3)
  Top Layer region: -2.296,1.707 -0.196,1.707 -0.196,4.307 -1.146,4.307 -2.296,3.157
  silkscreen extent -8.1,-8.8 7.85,9.05, body extent -7.85,-8.8 7.85,8.8, height 2.6
"IND_SMD 6X6X2.8MM" [mm]
  rect 2x5.7 smd: 1(-2.15,0) 2(2.15,0)
  silkscreen extent -0.83,-3 0.83,3, body extent -3,-3 3,3, height 2.81
IPEX [mm] "IPX surface mount receptacle plug"
  rect 1x1 smd: 1(1.5,0)
  rect 2.2x1.05 smd: 2(0,1.475) 2(0,-1.475)
  silkscreen extent -1.5,-1.5 1.5,1.5, body extent -1.5,-1.5 1.5,1.5, height 1.25
JP1X6F-P2.54-TH [mil]
  round 71 hole 40: 1(-250,0) 2(-150,0) 3(-50,0) 4(50,0) 5(150,0) 6(250,0)
  silkscreen extent -310,-50 310,50, body extent -310,-49 310,49, height 335
L0805 [mm]
  rect 0.95x1.3 smd: 1(1,0) 2(-1,0)
  silkscreen extent -1.5,-0.81 1.5,0.81, body extent -1,-0.61 1,0.64, height 0.78
LED_0805_AMBER [mm]
  rect 1.1x1.3 smd: 1(1.05,0) 2(-1.05,0)
  silkscreen extent -1.87,-0.9 -0.47,0.9, body extent -1,-0.62 1,0.62, height 0.8
LED_0805_RED [mm]
  rect 1.1x1.3 smd: 1(1.05,0) 2(-1.05,0)
  silkscreen extent -1.87,-0.9 -0.47,0.9, body extent -1.01,-0.62 1.01,0.63, height 1.1
MODULE_POWER_HLK-20M05 [mm]
  rect 1.8x1.8 hole 1.2: 1(-25.5,4.5)
  round 1.8 hole 1.2: 2(-25.5,-4.5) 3(25.5,13.5) 4(25.5,-13.5)
  silkscreen extent -29.35,-16.66 28.65,16.65, body extent -28.5,-16.5 28.5,16.5, height 22.51
"MOS-FET; SOT23" [mm]
  rrect50% 0.8x0.6 smd: 1(-1.01,0.95) 2(-1.01,-0.95) 3(1.01,0)
  silkscreen extent -0.29,-1.45 0.65,1.45, body extent -1.2,-1.45 1.2,1.45, height 1.16
MSIM-2-A [mm]
  rect 0.9x1.35 smd: C1(-5.07,8.19) C2(-2.53,8.19) C3(0.01,8.19) C5(-6.34,8.19) C6(-3.8,8.19) C7(-1.26,8.19)
  rect 1.55x2.6 smd: G1(-7.9,5.69) G2(7.9,5.69) G3(-7.9,-6.83) G4(7.9,-6.83)
  Keep-Out Layer region: 0.88,-1.18 -0.42,-1.18 -0.42,2.42 0.88,2.42
  Keep-Out Layer region: -1.25,-1.18 -2.97,-1.18 -2.97,2.42 -1.25,2.42
  Keep-Out Layer region: -3.79,-1.18 -5.51,-1.18 -5.51,2.42 -3.79,2.42
  Keep-Out Layer region: 0.88,-7.7 -0.42,-7.7 -0.42,-4.1 0.88,-4.1
  Keep-Out Layer region: -1.25,-7.7 -2.97,-7.7 -2.97,-4.1 -1.25,-4.1
  Keep-Out Layer region: -3.79,-7.7 -5.51,-7.7 -5.51,-4.1 -3.79,-4.1
  silkscreen extent -7.67,-8.58 7.67,9.6, body extent -8.15,-8.35 8.25,8.85, height 2.05
"NUT NHAN 2 CHAN SMD 3X6X2.5" [mm] "Switch SMD type"
  rect 1.2x0.8 smd: 1(-3.5,0) 2(3.5,0)
  silkscreen extent -2.82,-1.85 2.82,1.85, body extent -3.05,-1.85 3.05,1.85, height 2.5
PAD_SMD_D1.2MM [mm]
  round 1.2 smd: 0(0,0)
  silkscreen extent -0.84,-0.84 0.84,0.84
"PAD_SMD_D1.2MM - duplicate1" [mm]
  round 1.2 smd: 0(0,0)
  silkscreen extent -0.84,-0.84 0.84,0.84
QFN50P300X300X80-17N [mm]
  rrect25% 0.84x0.27 smd: 1(-1.435,0.75) 2(-1.435,0.25) 3(-1.435,-0.25) 4(-1.435,-0.75) 9(1.435,-0.75) 10(1.435,-0.25) 11(1.435,0.25) 12(1.435,0.75)
  rrect25% 0.27x0.84 smd: 5(-0.75,-1.435) 6(-0.25,-1.435) 7(0.25,-1.435) 8(0.75,-1.435) 13(0.75,1.435) 14(0.25,1.435) 15(-0.25,1.435) 16(-0.75,1.435)
  rect 1.1x1.1 smd paste-0.2: 17(0,0)
  silkscreen extent -2.57,-1.5 1.5,1.5, body extent -1.5,-1.5 1.5,1.5, height 0.9
RELAY_4P_PR23-24V-900-1A [mm]
  round 1.727 hole 1.143: A1(4.6,-9.16) A2(-5.6,-9.16)
  round 3.7 hole 2.1: COM(-9.4,3.5) NO(8.4,6.04)
  silkscreen extent -13.65,-16.33 13.79,16.18, body extent -13.65,-16.33 13.78,16.18, height 20.4
RESISTOR_0805_WAVE [mm]
  rrect50% 1.05x1.3 smd: 1(-1.175,0) 2(1.175,0)
  silkscreen extent -1.93,-0.89 1.93,0.89, body extent -1,-0.62 1,0.63, height 0.46
RESISTOR_0805_Wave [mm]
  rrect50% 1.05x1.3 smd: 1(-1.175,0) 2(1.175,0)
  silkscreen extent -1.93,-0.89 1.93,0.89, body extent -1,-0.62 1,0.63, height 0.46
SMA-J_DO-214AC [mm]
  rect 2.65x1.65 smd: 1(-2,0) 2(2,0)
  silkscreen extent -3.55,-1.49 3.81,1.46, body extent -2.8,-1.49 2.8,1.46, height 2.9
SOD-123 [mm]
  rect 1.21x0.73 smd: 1(1.68,0) 2(-1.68,0)
  silkscreen extent -1.43,-1.02 1.43,1, body extent -1.93,-0.85 1.93,0.85, height 1.36
SOD-123F/SOD-123FL [mm]
  rect 1.2x1 smd: 1(1.72,0) 2(-1.72,0)
  silkscreen extent -1.35,-0.95 1.35,0.99, body extent -1.9,-0.9 1.9,0.9, height 1.02
SOIC127P1032X265-16N [mil]
  rect 71x21 smd: 1(-188,175) 2(-188,125) 3(-188,75) 4(-188,25) 5(-188,-25) 6(-188,-75) 7(-188,-125) 8(-188,-175) 9(188,-175) 10(188,-125) 11(188,-75) 12(188,-25) 13(188,25) 14(188,75) 15(188,125) 16(188,175)
  silkscreen extent -150,-207 150,207, body extent -203,-203 203,203, height 104
SOIC_16_WIDE [mm]
  rrect25% 2.05x0.59 smd: 1(-4.655,4.445) 2(-4.655,3.175) 3(-4.655,1.905) 4(-4.655,0.635) 5(-4.655,-0.635) 6(-4.655,-1.905) 7(-4.655,-3.175) 8(-4.655,-4.445) 9(4.655,-4.445) 10(4.655,-3.175) 11(4.655,-1.905) 12(4.655,-0.635) 13(4.655,0.635) 14(4.655,1.905) 15(4.655,3.175) 16(4.655,4.445)
  silkscreen extent -3.75,-5.21 3.75,5.21, body extent -5.16,-5.15 5.16,5.15, height 2.65
SOP8 [mm]
  rect 0.6x1.75 smd: 1(-1.905,-2.8) 2(-0.635,-2.8) 3(0.635,-2.8) 4(1.905,-2.8) 5(1.905,2.8) 6(0.635,2.8) 7(-0.635,2.8) 8(-1.905,2.8)
  silkscreen extent -2.54,-0.89 -2.54,1.14, body extent -2.45,-3 2.45,3, height 1.75
SOT223 [mm]
  rrect15% 0.93x1.31 smd: 1(-2.29,-3.345) 2(0,-3.345) 3(2.29,-3.345)
  rrect15% 3.24x1.31 smd: 4(0,3.345)
  silkscreen extent -4.09,-3.4 3.25,1.75, body extent -3.25,-3.5 3.25,3.5, height 1.8
SOT-23-6 [mm]
  rect 1.21x0.59 smd: 1(-1.255,0.95) 2(-1.255,0) 3(-1.255,-0.95) 4(1.255,-0.95) 5(1.255,0) 6(1.255,0.95)
  silkscreen extent -2.08,-1.52 1.25,1.47, body extent -1.6,-1.46 1.6,1.46, height 1.17
SW_DS01C-254-S-10BE [mm]
  rect 1.58x1.58 / inner round 1.58 / far side rect 1.58x1.58 hole 1: 1A(-11.43,-3.81)
  round 1.58 hole 1: 1B(-11.43,3.81) 2A(-8.89,-3.81) 2B(-8.89,3.81) 3A(-6.35,-3.81) 3B(-6.35,3.81) 4A(-3.81,-3.81) 4B(-3.81,3.81) 5A(-1.27,-3.81) 5B(-1.27,3.81) 6A(1.27,-3.81) 6B(1.27,3.81) 7A(3.81,-3.81) 7B(3.81,3.81) 8A(6.35,-3.81) 8B(6.35,3.81) 9A(8.89,-3.81) 9B(8.89,3.81) 10A(11.43,-3.81) 10B(11.43,3.81)
  silkscreen extent -13.41,-5.8 13.41,4.95, body extent -13.33,-4.95 13.48,4.95, height 7.18
TE_796644-7 [mm]
  rect 2.25x2.25 / inner round 2.25 / far side rect 2.25x2.25 hole 1.5: 1(-14.75,4)
  round 2.25 hole 1.5: 2(-9.75,4) 3(-4.75,4) 4(0.25,4) 5(5.25,4) 6(10.25,4) 7(15.25,4)
  silkscreen extent -19.25,-6 18.5,6, body extent -18.54,-6.03 18.46,5.97, height 9.58
TERMINAL_12P_9.5MM [mm]
  round 3.5 hole 1.7 mask+0.2: 1(0,0) 2(9.5,0) 3(19,0) 4(28.5,0) 5(38,0) 6(47.5,0) 7(57,0) 8(66.5,0) 9(76,0) 10(85.5,0) 11(95,0) 12(104.5,0)
  silkscreen extent -5.56,-13.26 110.29,4.52, body extent -5.56,-13.26 110.29,4.52, height 17.76
ULN2003 [mm]
  rrect50% 0.46x1.7 smd mask+0.1: 1(0,0) 2(1.27,0) 3(2.54,0) 4(3.81,0) 5(5.08,0) 6(6.35,0) 7(7.62,0) 8(8.89,0) 9(8.89,5.7) 10(7.62,5.7) 11(6.35,5.7) 12(5.08,5.7) 13(3.81,5.7) 14(2.54,5.7) 15(1.27,5.7) 16(0,5.7)
  silkscreen extent -0.5,1.46 9.37,4.13, body extent -0.49,-0.17 9.41,5.83, height 1.73
VARISTOR_DISC10MM [mm]
  round 1.4 hole 1.05: 1(-3.75,0.973) 2(3.75,-0.973)
  silkscreen extent -6,-2.8 6,2.8, body extent -6.25,-2 6.25,2, height 15.6

## Part data
+3V3 +3V9 +5V +12V GND GND: library part TEST_POIT_1MM_SMD, "TEST POINT 1MM", LIBRARY MADE BY="MR. XUAN SIEU", Supplier=MHT
AT1: "Antenna"
BH1: library part "BATT_HOLDER_SMD; BATTERY HOLDER COIN 12.5MM; 1056", "Battery Holder, SMT, 1 Coin Cell, 12mm, Plastic, UL94V-0", Color=Black, Manufacturer=Keystone, Manufacturer Part Number=1056, Max Operating Temperature=145°C, Min Operating Temperature=-50°C, Supplier Part Number 1=36-1056-ND, Category="Batteries and Accessories", ComponentLink1Description=https://datasheet.octopart.com:443/1056-Keystone-datasheet-15715033.pdf?src-supplier=Future+Electronics, ComponentLink1URL=https://datasheet.octopart.com:443/1056-Keystone-datasheet-15715033.pdf?src-supplier=Future+Electronics, ComponentLink2Description=https://datasheet.octopart.com:443/1056-Keystone-datasheet-8326175.pdf?src-supplier=Future+Electronics, ComponentLink2URL=https://datasheet.octopart.com:443/1056-Keystone-datasheet-8326175.pdf?src-supplier=Future+Electronics, ComponentLink3Description=https://datasheet.octopart.com:443/1056-Keystone-datasheet-137916583.pdf?src-supplier=LKR, ComponentLink3URL=https://datasheet.octopart.com:443/1056-Keystone-datasheet-137916583.pdf?src-supplier=LKR, ComponentLink4Description=https://datasheet.octopart.com:443/1056-Keystone-datasheet-137320296.pdf?src-supplier=Sager+Electronics, ComponentLink4URL=https://datasheet.octopart.com:443/1056-Keystone-datasheet-137320296.pdf?src-supplier=Sager+Electronics, ComponentLink5Description=https://datasheet.octopart.com:443/1056-Keystone-datasheet-62112666.pdf?src-supplier=RS+(Formerly+Allied+Electronics), ComponentLink5URL=https://datasheet.octopart.com:443/1056-Keystone-datasheet-62112666.pdf?src-supplier=RS+(Formerly+Allied+Electronics), ComponentLink6Description=https://datasheet.octopart.com:443/1056-Keystone-datasheet-21202752.pdf?src-supplier=Newark, ComponentLink6URL=https://datasheet.octopart.com:443/1056-Keystone-datasheet-21202752.pdf?src-supplier=Newark, ComponentLink7Description=https://datasheet.octopart.com:443/1056-Keystone-datasheet-17577351.pdf?src-supplier=TME, ComponentLink7URL=https://datasheet.octopart.com:443/1056-Keystone-datasheet-17577351.pdf?src-supplier=TME, ComponentLink8Description=https://datasheet.octopart.com:443/1056-Keystone-datasheet-176783336.pdf?src-supplier=SOS+electronic, ComponentLink8URL=https://datasheet.octopart.com:443/1056-Keystone-datasheet-176783336.pdf?src-supplier=SOS+electronic, Lead Free="Lead Free", LIBRARY MADE BY="MR. XUAN SIEU", Lifecycle Status=Production, LINK ORIGINAL=https://www.digikey.com/en/products/detail/keystone-electronics/1056/2020198, LINK VIET NAM=https://linhkien.cxtvn.com/1651-de-pin-cr1220-3v-han-dan.html, Mount="PCB, Surface Mount", Number of Batteries=1, Number of Cells=1, Pricing 1="1=1.1, 1000=0.41, 2500=0.38, 5000=0.35 (USD)", REACH SVHC=Yes, RoHS=Compliant, Stock 1=79944, Supplier 1=DigiKey, Termination=SMD/SMT
C1 C51: "Cap Aluminum Lytic 470uF 35V 20% (10 X 10.2mm) SMD 0.08 Ohm 850mA 2000h 105Â°C Automotive T/R", Package="RADIAL-2 Panasonic", Check_prices=https://www.snapeda.com/parts/EEEFK1V471SL/Panasonic/view-part/?ref=eda, MF=Panasonic, MP=EEEFK1V471SL, SnapEDA_Link=https://www.snapeda.com/parts/EEEFK1V471SL/Panasonic/view-part/?ref=snap
C2 C20: library part "CAP_CER_SMD; 1UF 50V X7R 0805 10%", "Cap Ceramic 1uF 50V X7R 10% SMD 0805 125°C Embossed Plastic T/R", Capacitance=1uF, Case Code (Imperial)=0805, Case Code (Metric)=2012, Dielectric=X7R, Manufacturer Cross=Samsung, Manufacturer Part Number=CL21B105KBFNNNG, Max Operating Temperature=125°C, Min Operating Temperature=-55°C, Package Quantity=3000, Supplier Part Number 1=1276-6470-1-ND, Tolerance=10%, Voltage=50V, Case/Package=0805, Category="Ceramic Capacitors", ComponentLink1Description=https://datasheet.ciiva.com/25733/cl21b105kbfnnng-25733278.pdf?src-supplier=Digikey, ComponentLink1URL=https://datasheet.ciiva.com/25733/cl21b105kbfnnng-25733278.pdf?src-supplier=Digikey, ComponentLink2Description=https://datasheet.ciiva.com/29199/455898-da-01-en-vs-kondensator-0805-29199201.pdf?src-supplier=Conrad, ComponentLink2URL=https://datasheet.ciiva.com/29199/455898-da-01-en-vs-kondensator-0805-29199201.pdf?src-supplier=Conrad, ComponentLink3Description=https://datasheet.ciiva.com/26310/mlcc-catalogdownload2013-eng-26310125.pdf?src-supplier=Distrelec, ComponentLink3URL=https://datasheet.ciiva.com/26310/mlcc-catalogdownload2013-eng-26310125.pdf?src-supplier=Distrelec, ComponentLink4Description=https://datasheet.ciiva.com/16428/cl05b104kq5nnnc-16428872.pdf?src-supplier=Future+Electronics, ComponentLink4URL=https://datasheet.ciiva.com/16428/cl05b104kq5nnnc-16428872.pdf?src-supplier=Future+Electronics, ComponentLink5Description="Link Original", ComponentLink5URL=https://www.digikey.com/en/products/detail/samsung-electro-mechanics/CL21B105KBFNNNG/3894467?s=N4IgTCBcDaIMIBkwEYBCyAMBWA0qgYgHLEDiIAugL5A, ComponentLink6Description="Link Cross", ComponentLink6URL=https://www.lcsc.com/product-detail/Multilayer-Ceramic-Capacitors-MLCC-SMD-SMT_Samsung-Electro-Mechanics-CL21B105KBFNNNE_C28323.html?s_z=n_CL21B105KBFNNNG, ComponentLink7Description="Link Viet Nam", ComponentLink7URL=https://linhkien.cxtvn.com/6335-c0805c105k5pac7800-cap-cer-1uf-50v-10-x5r-0805.html, Depth=1.25mm, Length=0.079inch, LIBRARY MADE BY="MR. XUAN SIEU", Material=Ceramic, Mount="Surface Mount", Packaging="Tape and Reel", Pricing 1="1=0.11, 10=0.06, 100=0.0358, 1000=0.02348 (USD)", RoHS=Yes, RoHS Compliant=Yes, Series=CL, Stock 1=238551, Supplier 1=Digikey, Thickness=0.053inch, Voltage Rating=50V, Voltage Rating (DC)=50V, Width=0.049inch
C3 C64 C83 C85: library part "CAP ALUM 220UF 20% 16V SMD", "CAP ALUM 220UF 20% 16V SMD", Package="RADIAL-2 Panasonic", Check_prices=https://www.snapeda.com/parts/EEEFKC221XAL/Panasonic/view-part/?ref=eda, MF=Panasonic, MP=EEEFKC221XAL, SnapEDA_Link=https://www.snapeda.com/parts/EEEFKC221XAL/Panasonic/view-part/?ref=snap
C4 C9 C13 C14 C15 C19 C24 C25 C27 C33 C38 C39 C42 C44 C45 C46 C47 C48 C49 C50 C52 C53 C54 C56 C58 C60 C65 C66 C69 C70 C73 C77 C80 C84 C86: library part "CAP_CER_SMD; 0.1UF 50V X7R 0805 10%", "0.1 (104) µF ±10% 50V Ceramic Capacitor X7R 0805 (2012 Metric)", Capacitance=100nF, Case Code (Imperial)=0805, Case Code (Metric)=2012, Dielectric=X7R, Insulation Resistance=100GR, Manufacturer Cross=Yageo, Manufacturer Part Number=CC0805KRX7R9BB104, Max Operating Temperature=125°C, Min Operating Temperature=-55°C, Package Quantity=4000, Supplier Part Number 1=311-1140-1-ND, Tolerance=10%, Voltage=50V, Case/Package=0805, Category="Ceramic Capacitors", ComponentLink1Description=https://datasheet.ciiva.com/46393/1734573-46393307.pdf?src-supplier=Element14, ComponentLink1URL=https://datasheet.ciiva.com/46393/1734573-46393307.pdf?src-supplier=Element14, ComponentLink2Description=https://datasheet.ciiva.com/155/mlccorderingcode-155930.pdf?src-supplier=Digikey, ComponentLink2URL=https://datasheet.ciiva.com/155/mlccorderingcode-155930.pdf?src-supplier=Digikey, ComponentLink3Description=https://datasheet.ciiva.com/29242/445210-da-01-en-kerko-chip-0805-x7r-0-1uf-10proz-50vg-29242074.pdf?src-supplier=Conrad, ComponentLink3URL=https://datasheet.ciiva.com/29242/445210-da-01-en-kerko-chip-0805-x7r-0-1uf-10proz-50vg-29242074.pdf?src-supplier=Conrad, ComponentLink4Description="Link Cross", ComponentLink4URL=https://www.lcsc.com/product-detail/Multilayer-Ceramic-Capacitors-MLCC-SMD-SMT_YAGEO-CC0805KRX7R9BB104_C49678.html?s_z=n_CC0805KRX7R9BB104, ComponentLink5Description="Link Viet Nam", ComponentLink5URL=https://linhkien.cxtvn.com/1976-tu-khong-phan-cuc-0805.html, ComponentLink6Description="Link Original", ComponentLink6URL=https://www.digikey.com/en/products/detail/yageo/CC0805KRX7R9BB104/302874, Depth=1.25mm, Halogen Free=5694HalogenFree, Height=0.85mm, Lead Free=5697LeadFree, Length=2mm, LIBRARY MADE BY="MR. XUAN SIEU", Material=Ceramic, Mount="Surface Mount", Number of Pins=2, Packaging="Tape and Reel", Pricing 1="1=0.08, 10=0.032, 100=0.026, 1000=0.02, 4000=0.0176, 8000=0.01595, 12000=0.01512, 20000=0.0142, 28000=0.01367, 40000=0.01315, 100000=0.01202, 200000=0.01134, 400000=0.01077 (USD)", Radiation Hardening=No, Reach SVHC Compliant=No, RoHS=Yes, RoHS Compliant=Yes, Series=CC, Stock 1=3664790, Supplier 1=Digikey, Termination=SMD/SMT, Voltage Rating=50V
C5: library part "CAP_CER_SMD; 0.33UF 50V X7R 0805 10%", "0.33 µF ±10% 50V Ceramic Capacitor X7R 0805 (2012 Metric)", Capacitance=330nF, Case Code (Imperial)=0805, Case Code (Metric)=2012, Manufacturer="Wurth Electronics", Manufacturer Part Number=885012207101, Max Operating Temperature=125°C, Min Operating Temperature=-55°C, Supplier Part Number 1=732-7676-1-ND, Tolerance=10%, Voltage Rating=50V, Case/Package=0805, Category="Ceramic Capacitors", ComponentLink1Description=https://katalog.we-online.de/pbs/datasheet/885012207101.pdf?src-supplier=Digikey, ComponentLink1URL=https://katalog.we-online.de/pbs/datasheet/885012207101.pdf?src-supplier=Digikey, Length=0.079inch, LIBRARY MADE BY="MR. XUAN SIEU", LINK ORIGINAL=https://www.digikey.com/en/products/detail/w%C3%BCrth-elektronik/885012207101/5453531, LINK VIET NAM=https://linhkienchatluong.vn/tu-dan-0805/tu-dan-0805-334-330nf-033uf-50v-10c_sp1293_ct14678.aspx, Mount="Surface Mount", Packaging="Cut Tape", Pricing 1="1=0.17, 10=0.151, 100=0.136, 500=0.121 (USD)", RoHS=Yes, RoHS Compliant=Yes, Series=WCAP-CSGP, Stock 1=79, Supplier 1=Digikey, Thickness=0.053inch, Width=0.049inch
C6 C18 C21 C35 C67 C71 C78 C82: library part "CAP_CER_SMD; 1000PF 50V X7R 0805 10%", "1000 pF (102,1nF) ±10% 50V Ceramic Capacitor X7R 0805 (2012 Metric),", Capacitance=1nF, Case Code (Imperial)=0805, Case Code (Metric)=2012, Dielectric=X7R, Dielectric Material=4241ConductorMaterial, Manufacturer Cross=KEMET, Manufacturer Part Number=C0805C102K5RACTU, Max Operating Temperature=125°C, Min Operating Temperature=-55°C, Package Quantity=4000, Supplier Part Number 1=399-C0805C102K5RACTUCT-ND, Temperature Coefficient=30ppm/°C, Tolerance=10%, Voltage=50V, Case/Package=0805, Category="Ceramic Capacitors", ComponentLink1Description=https://www.distrelec.biz/Web/Downloads/_t/ds/KEM_C1002_X7R_SMD_eng_tds.pdf?mime=application%2Fpdf&src-supplier=Distrelec, ComponentLink1URL=https://www.distrelec.biz/Web/Downloads/_t/ds/KEM_C1002_X7R_SMD_eng_tds.pdf?mime=application%2Fpdf&src-supplier=Distrelec, ComponentLink2Description=http://www.farnell.com/datasheets/2740679.pdf?src-supplier=Farnell, ComponentLink2URL=http://www.farnell.com/datasheets/2740679.pdf?src-supplier=Farnell, ComponentLink3Description=http://www.onlinecomponents.com/productFiles/mf-KEM/kem_c1002_x7r_smd.pdf?src-supplier=Onlinecomponents.com, ComponentLink3URL=http://www.onlinecomponents.com/productFiles/mf-KEM/kem_c1002_x7r_smd.pdf?src-supplier=Onlinecomponents.com, ComponentLink4Description=http://www.farnell.com/datasheets/2740679.pdf?src-supplier=Element14, ComponentLink4URL=http://www.farnell.com/datasheets/2740679.pdf?src-supplier=Element14, ComponentLink5Description=https://datasheet.octopart.com/C0805C102K5RACTU-Kemet-datasheet-24570007.pdf?src-supplier=Element14, ComponentLink5URL=https://datasheet.octopart.com/C0805C102K5RACTU-Kemet-datasheet-24570007.pdf?src-supplier=Element14, ComponentLink6Description=https://api.kemet.com/component-edge/download/datasheet/C0805C102K5RACTU.pdf?src-supplier=Digikey, ComponentLink6URL=https://api.kemet.com/component-edge/download/datasheet/C0805C102K5RACTU.pdf?src-supplier=Digikey, ComponentLink7Description=http://www.farnell.com/datasheets/2740679.pdf?src-supplier=Newark, ComponentLink7URL=http://www.farnell.com/datasheets/2740679.pdf?src-supplier=Newark, ComponentLink8Description=https://www.alliedelec.com/m/d/9bfe7773041ffe9d406e68bc7b377fdd.pdf?src-supplier=Allied+Electronics, ComponentLink8URL=https://www.alliedelec.com/m/d/9bfe7773041ffe9d406e68bc7b377fdd.pdf?src-supplier=Allied+Electronics, ComponentLink9Description="Link Viet Nam", ComponentLink9URL=https://linhkien.cxtvn.com/3023-tu-khong-phan-cuc-0805.html, ComponentLink10Description="Link Cross", ComponentLink10URL=https://www.lcsc.com/product-detail/Multilayer-Ceramic-Capacitors-MLCC-SMD-SMT_KEMET-C0805C102K5RACTU_C2167366.html?s_z=n_C0805C102K5RACTU, ComponentLink11Description="Link Original", ComponentLink11URL=https://www.digikey.com/en/products/detail/kemet/C0805C102K5RACTU/411146, Construction=Flat, Depth=1.25mm, Height=0.78mm, Lead Free=5697LeadFree, Lead Pitch=0.75mm, Length=2mm, LIBRARY MADE BY="MR. XUAN SIEU", Material=4241ConductorMaterial, Mount="Surface Mount,PCB", Number of Pins=2, Packaging="Tape and Reel", Pricing 1="1=0.11, 10=0.061, 50=0.042, 100=0.0362, 500=0.02634, 1000=0.02329, 4000=0.01874, 8000=0.01701, 12000=0.01614, 20000=0.01517, 28000=0.0146, 40000=0.01406, 100000=0.01287, 200000=0.01215, 400000=0.01155 (USD)", Radiation Hardening=No, Reach SVHC Compliant=No, RoHS=Yes, RoHS Compliant=Yes, Series="SMD Comm X7R", Stock 1=269175, Supplier 1=Digikey, Termination=SMD/SMT, Thickness=889um, Voltage Rating=50V, Voltage Rating (DC)=50V, Width=1.25mm
C7 C63: library part "CAP ALUM 220UF 20% 35V SMD", "CAP ALUM 220UF 20% 35V SMD", Package="RADIAL-2 Panasonic", Check_prices=https://www.snapeda.com/parts/EEEFKC221XAL/Panasonic/view-part/?ref=eda, MF=Panasonic, MP=EEEFKC221XAL, SnapEDA_Link=https://www.snapeda.com/parts/EEEFKC221XAL/Panasonic/view-part/?ref=snap
C8 C12 C23 C26 C55 C57 C59 C68 C74 C76 C79 C81: library part "CAP_CER_SMD; 10UF 25V X5R 0805 10%", "10 µF ±10% 25V Ceramic Capacitor X5R 0805 (2012 Metric)", Capacitance=10uF, Case Code (Imperial)=0805, Case Code (Metric)=2012, Dielectric=X5R, Manufacturer Cross=Murata, Manufacturer Part Number=GRM21BR61E106KA73L, Max Operating Temperature=85°C, Min Operating Temperature=-55°C, Package Quantity=1, Supplier Part Number 1=490-5523-6-ND, Tolerance=10%, Voltage=25V, Case/Package=0805, Category="Ceramic Capacitors", ComponentLink1Description=https://datasheet.ciiva.com/22774/1747469-22774396.pdf?src-supplier=Farnell, ComponentLink1URL=https://datasheet.ciiva.com/22774/1747469-22774396.pdf?src-supplier=Farnell, ComponentLink2Description=https://datasheet.ciiva.com/28584/626718-28584288.pdf?src-supplier=Element14, ComponentLink2URL=https://datasheet.ciiva.com/28584/626718-28584288.pdf?src-supplier=Element14, ComponentLink3Description=https://datasheet.ciiva.com/5424/product-5424327.pdf?src-supplier=Mouser, ComponentLink3URL=https://datasheet.ciiva.com/5424/product-5424327.pdf?src-supplier=Mouser, ComponentLink4Description=https://datasheet.ciiva.com/29199/454623-da-01-en-vs-kondensator-0805-29199615.pdf?src-supplier=Conrad, ComponentLink4URL=https://datasheet.ciiva.com/29199/454623-da-01-en-vs-kondensator-0805-29199615.pdf?src-supplier=Conrad, ComponentLink5Description=https://datasheet.ciiva.com/14116/grmseries-highdielectrictype-eng-14116376.pdf?src-supplier=Distrelec, ComponentLink5URL=https://datasheet.ciiva.com/14116/grmseries-highdielectrictype-eng-14116376.pdf?src-supplier=Distrelec, ComponentLink6Description=https://datasheet.ciiva.com/7719/1747469-7719093.pdf?src-supplier=Element14, ComponentLink6URL=https://datasheet.ciiva.com/7719/1747469-7719093.pdf?src-supplier=Element14, ComponentLink7Description=https://datasheet.ciiva.com/28584/626718-28584279.pdf?src-supplier=Element14, ComponentLink7URL=https://datasheet.ciiva.com/28584/626718-28584279.pdf?src-supplier=Element14, ComponentLink8Description=https://datasheet.ciiva.com/139/partnumbering-e-01-139183.pdf?src-supplier=Digikey, ComponentLink8URL=https://datasheet.ciiva.com/139/partnumbering-e-01-139183.pdf?src-supplier=Digikey, ComponentLink9Description=https://datasheet.ciiva.com/139/partnumbering-e-01-139182.pdf?src-supplier=Digikey, ComponentLink9URL=https://datasheet.ciiva.com/139/partnumbering-e-01-139182.pdf?src-supplier=Digikey, ComponentLink10Description=https://datasheet.ciiva.com/139/partnumbering-e-01-139184.pdf?src-supplier=Digikey, ComponentLink10URL=https://datasheet.ciiva.com/139/partnumbering-e-01-139184.pdf?src-supplier=Digikey, ComponentLink11Description="Link Viet Nam", ComponentLink11URL=https://linhkien.cxt.vn/5861-tmk212bbj106mg-t-cap-cer-10uf-25v-x5r-0805.html, ComponentLink12Description="Link Original", ComponentLink12URL=https://www.digikey.com/en/products/detail/murata-electronics/GRM21BR61E106KA73L/2334874, ComponentLink13Description="Link Cross", ComponentLink13URL=https://www.lcsc.com/product-detail/Multilayer-Ceramic-Capacitors-MLCC-SMD-SMT_Murata-Electronics-GRM21BR61E106KA73L_C84416.html, Construction=Flat, Depth=1.25mm, Height=1.25mm, Lead Free=5697LeadFree, Length=2mm, LIBRARY MADE BY="MR. XUAN SIEU", Material=Ceramic, Mount="Surface Mount", Packaging="Tape and Reel", Pricing 1="1=0.2, 10=0.086, 50=0.0696, 100=0.0528, 500=0.0484, 1000=0.044 (USD)", Reach SVHC Compliant=No, RoHS=Yes, RoHS Compliant=Yes, Series=GRM, Stock 1=1799838, Supplier 1=Digikey, Termination=SMD/SMT, Thickness=0.053inch, Voltage Rating=25V, Voltage Rating (DC)=25V, Width=0.049inch